# Altium PCB WGI_BOARD.PcbDoc (part 3 of 3)
Units mm, origin at the board's own origin, x right, y up, seen from the top; angles counter-clockwise.
Board outline 79.5 x 49.7 mm, 4 copper layers (Top Layer, Layer 1, Layer 2, Bottom Layer), stack 1.454 mm thick; 210 components, 179 nets, 665 pads, 228 vias.
Unrouted connection lines stored in the file: 133.
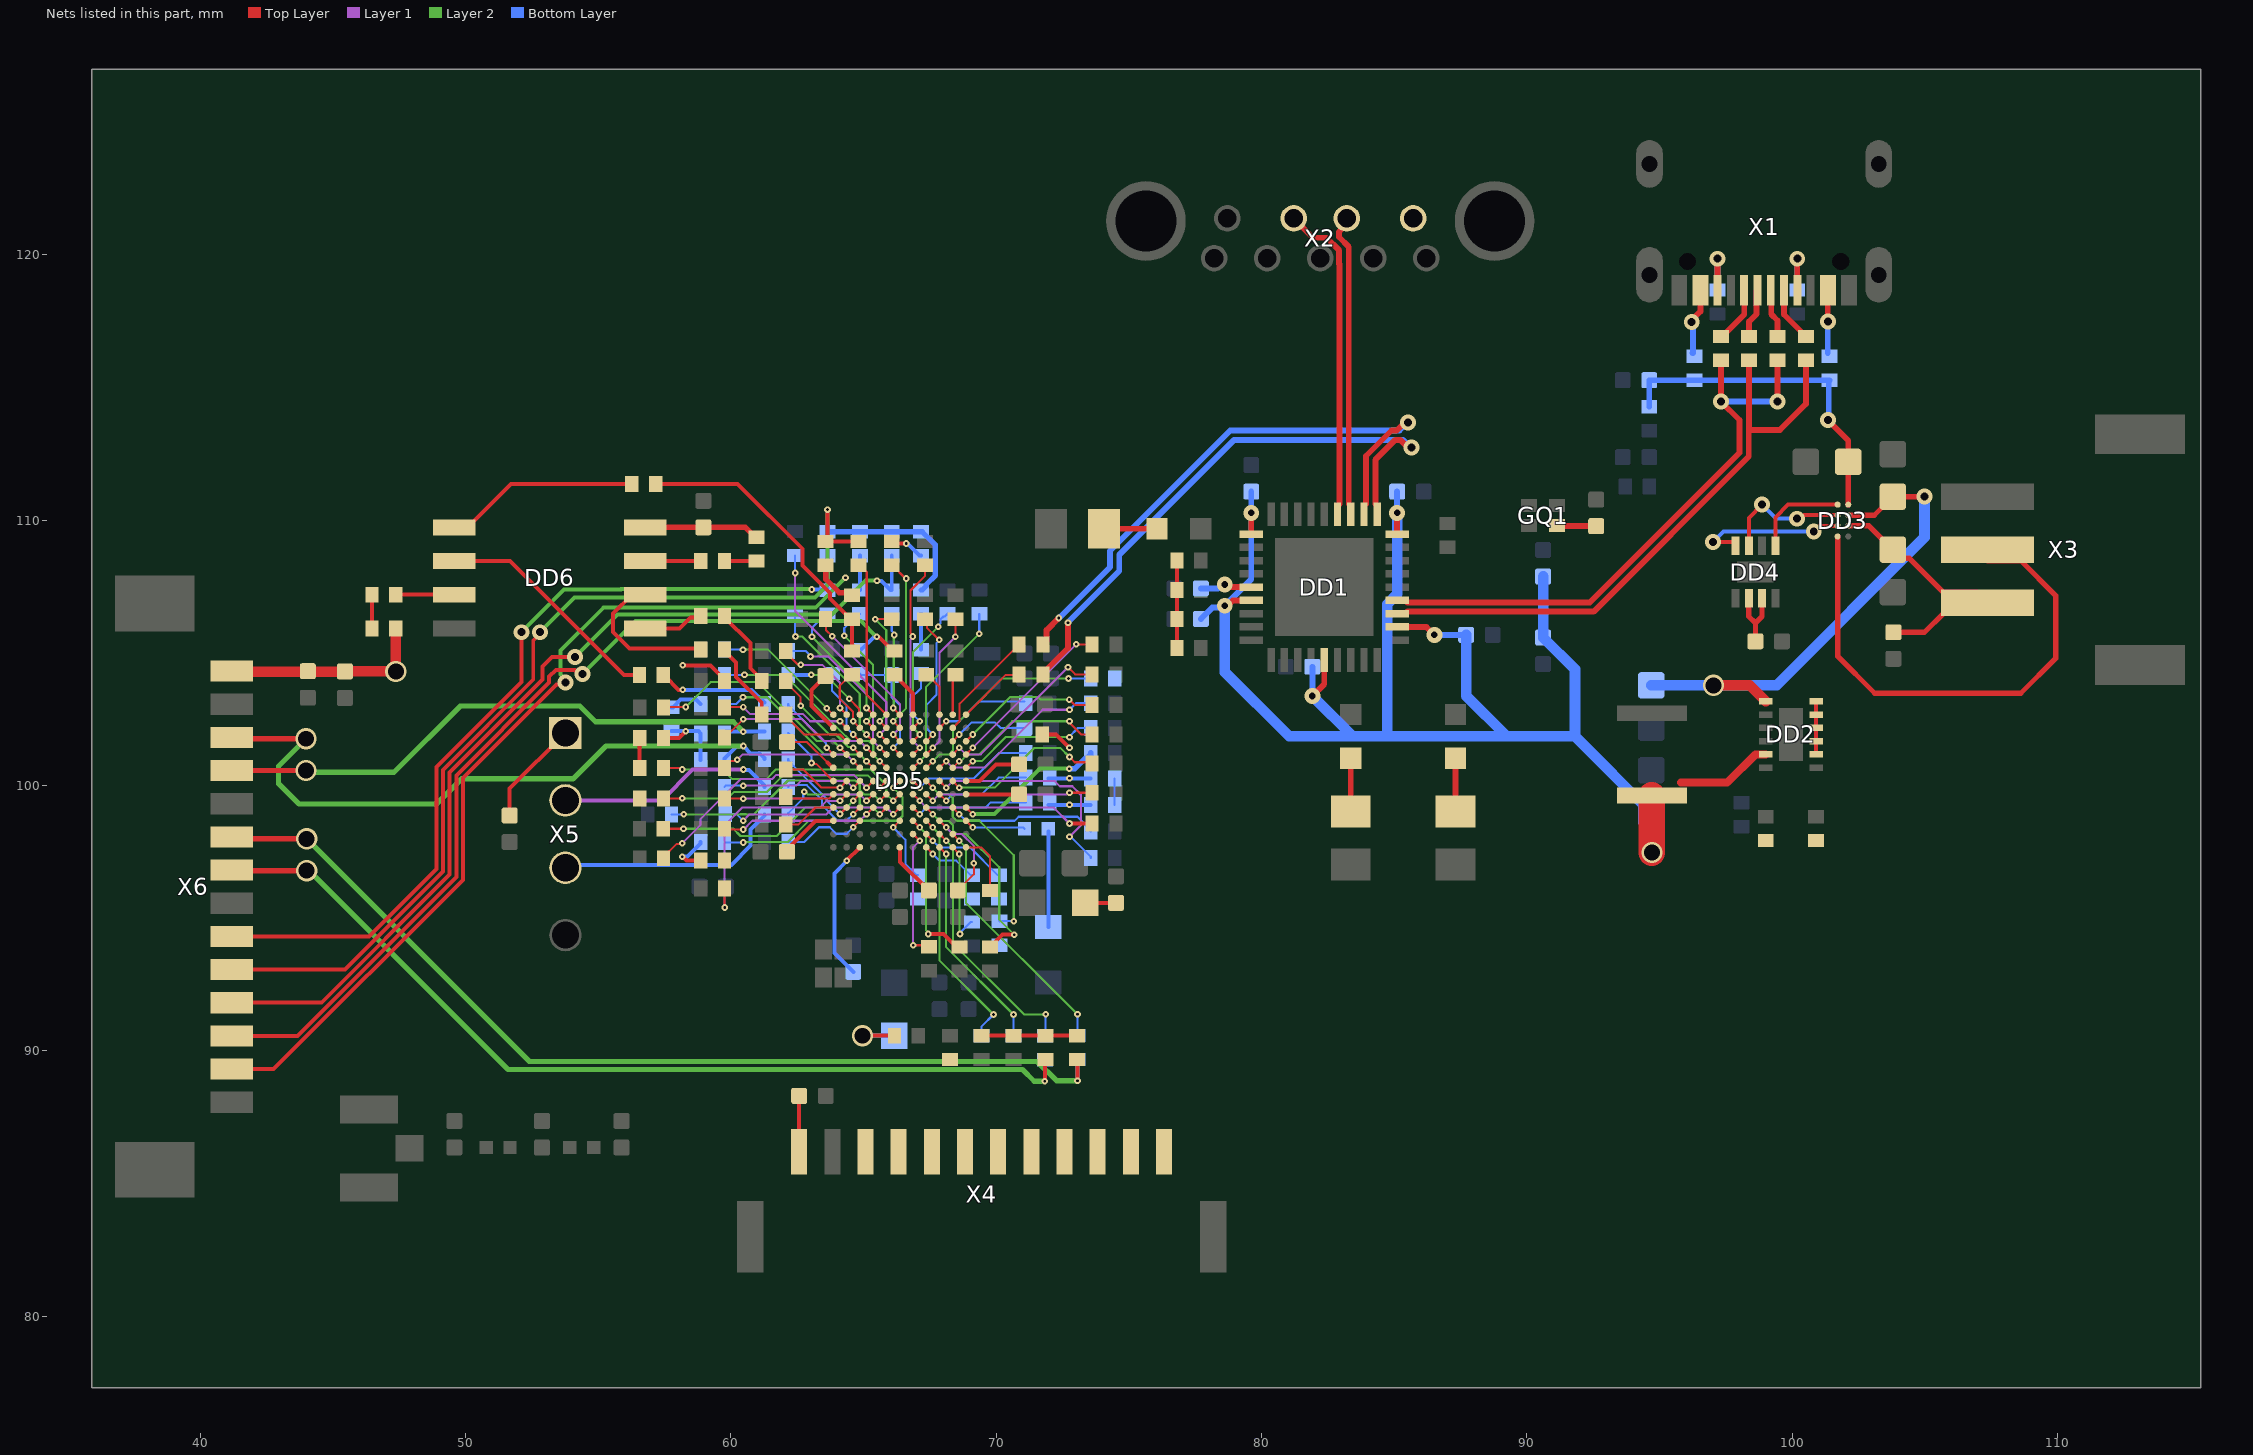
[diagram p4: the nets of this part, all layers, seen from the top]

## Via types
v1: diameter 0.25, hole 0.1, Top Layer to Bottom Layer, 179 vias
v2: diameter 0.6, hole 0.3, Top Layer to Bottom Layer, 24 vias
v3: diameter 0.8, hole 0.6, Top Layer to Bottom Layer, 18 vias
v4: diameter 0.6, hole 0.25, Top Layer to Bottom Layer, 7 vias

## Nets (pads, with @x,y where several pads share a name; then routed paths per layer and width w, separated by ;. In a path a pad name is that pad's centre, name@x,y a point inside that pad or via, vN(x,y) a via of type N, cw(c..) or ccw(c..) an arc to the next point about the centre after c; other vN are vias at no path point) (continued)
NetDD3_A1: DD3.A1 DD4.5 R109.1 R128.1 | length 4.9
  Top Layer w0.15: R128.1@66.06,109.17 66.11,109.12 v1(66.602,109.12) ; DD4.5@99.361,109.035 99.361,110.104 99.843,110.586 DD3.A1@101.71,110.586
  Bottom Layer w0.15: v1@66.652,109.12 67.11,108.662 R109.1@67.16,108.662
NetDD3_B1: DD3.B1 DD4.7 R26.1 R51.1 X4.9 | length 6.5
  Top Layer w0.15: DD4.7@98.361,109.035 98.361,110.086 v2(98.861,110.586) ; v2(100.186,110.055) 100.308,110.055 100.439,110.186 DD3.B1@101.71,110.186
  Bottom Layer w0.15: R51.1@71.96,100.27 v1(72.76,100.27) R26.1@73.56,100.27 ; v2(98.861,110.586) 99.392,110.055 v2(100.186,110.055)
NetDD3_C1: DD3.C1 DD4.8 R27.1 R52.1 X4.10 | length 7.5
  Top Layer w0.15: v2(97.01,109.175) 97.786,109.175 97.861,109.1 DD4.8@97.861,109.035 ; v2(100.81,109.575) 101.021,109.786 DD3.C1@101.71,109.786
  Bottom Layer w0.15: R52.1@71.96,99.27 v1(72.76,99.27) R27.1@73.56,99.27 ; v2(97.01,109.175) 97.41,109.575 v2(100.81,109.575)
NetDD5_A1: DD5.A1 R22.2 | length 2.3
  Top Layer w0.08: DD5.A1@68.86,97.67 69.435,97.67 69.76,97.345 R22.2@69.76,96.046
NetDD5_A2: DD5.A2 R39.2 | length 4.1
  Top Layer w0.08: DD5.A2@68.36,97.67 v1(68.61,97.42)
  Layer 2 w0.08: v1(68.61,97.42) 68.61,94.424 v1(68.631,94.403)
  Bottom Layer w0.08: v1@68.631,94.379 68.631,94.453 69.031,94.853 R39.2@69.081,94.853
NetDD5_A3: DD5.A3 R41.2 | length 8.3
  Top Layer w0.08: DD5.A3@67.86,97.67 v1(68.11,97.42)
  Layer 2 w0.08: v1(68.11,97.42) 68.11,93.907 v1(70.647,91.37)
  Bottom Layer w0.08: R41.2@70.647,90.57 v1(70.647,91.37)
NetDD5_A4: DD5.A4 R78.2 | length 2.2
  Top Layer w0.08: DD5.A4@67.36,97.67 v1(67.61,97.42)
  Bottom Layer w0.08: v1(67.61,97.42) 67.86,97.17 68.489,97.17 69.039,96.62 R78.2@69.089,96.62
NetDD5_B2: DD5.B2 R81.2 | length 9.5
  Top Layer w0.08: DD5.B2@68.36,98.17 v1(68.61,97.92)
  Layer 2 w0.08: v1(68.61,97.92) 68.855,97.675 68.855,95.58 v1(73.06,91.375)
  Bottom Layer w0.08: R81.2@73.06,90.575 v1(73.06,91.375)
NetDD5_B3: DD5.B3 R83.2 | length 9.7
  Top Layer w0.08: DD5.B3@67.86,98.17 v1(68.11,97.92)
  Layer 2 w0.08: v1(68.11,97.92) 68.365,97.665 68.365,94.056 71.046,91.375 v1(71.86,91.375)
  Bottom Layer w0.08: R83.2@71.86,90.575 v1(71.86,91.375)
NetDD5_B4: DD5.B4 R54.2 | length 3.4
  Top Layer w0.08: DD5.B4@67.36,98.17 v1(67.61,97.92)
  Bottom Layer w0.08: v1(67.61,97.92) 67.865,97.665 69.015,97.665 70.06,96.62 R54.2@70.11,96.62
NetDD5_B5: DD5.B5 R84.2 | length 5.1
  Top Layer w0.08: DD5.B5@66.86,98.17 v1(67.11,97.92) ; v1(66.865,93.978) 67.399,93.978 R84.2@67.457,93.92
  Layer 1 w0.08: v1@66.915,93.928 v1(66.865,93.978) 66.865,97.675 v1(67.11,97.92)
NetDD5_C1: DD5.C1 L3.2 | length 2.3
  Top Layer w0.08: DD5.C1@68.86,98.67 v1(69.11,98.42)
  Bottom Layer w0.08: v1(69.11,98.42) 71.01,98.42 L3.2@71.06,98.37
NetDD5_C4: DD5.C4 R40.2 | length 9.3
  Top Layer w0.08: DD5.C4@67.36,98.67 v1(67.61,98.42)
  Layer 2 w0.08: v1(67.61,98.42) 67.855,98.175 67.855,93.412 v1(69.897,91.37)
  Bottom Layer w0.08: R40.2@69.447,90.57 69.447,90.92 v1(69.897,91.37)
NetDD5_C5: DD5.C5 R82.2 | length 5.8
  Top Layer w0.08: DD5.C5@66.86,98.67 v1(67.11,98.42)
  Top Layer w0.15: v1(67.44,94.403) 68.018,94.403 68.508,93.913 R82.2@68.558,93.913
  Layer 2 w0.08: v1(67.11,98.42) 67.355,98.175 67.355,94.534 67.44,94.449 v1(67.44,94.403)
NetDD5_C6: DD5.C6 R80.2 | length 2.6
  Top Layer w0.08: v1(66.11,98.42) DD5.C6@66.36,98.67
  Bottom Layer w0.08: v1(66.11,98.42) 66.573,97.957 66.573,97.043 66.996,96.62 R80.2@67.046,96.62
NetDD5_C9: DD5.C9 R105.2 | length 3.2
  Top Layer w0.08: v1(64.61,98.425) 64.613,98.425 64.858,98.67 DD5.C9@64.86,98.67
  Bottom Layer w0.08: R105.2@62.16,97.87 62.76,97.87 63.317,98.427 63.73,98.427 63.975,98.182 64.367,98.182 v1(64.61,98.425)
NetDD5_D1: DD5.D1 R77.2 | length 5.8
  Top Layer w0.08: DD5.D1@68.86,99.17 v1(69.11,98.92)
  Layer 2 w0.15: v1(69.11,98.92) 69.941,98.92 71.656,100.635 v1(72.744,100.635)
  Bottom Layer w0.2: v1(72.744,100.635) 72.963,100.635 73.36,101.032 73.41,101.032 73.56,101.182 R77.2@73.56,101.232
NetDD5_D2: DD5.D2 R53.2 | length 5.7
  Top Layer w0.08: DD5.D2@68.36,99.17 v1(68.61,98.92)
  Bottom Layer w0.08: v1(68.61,98.92) 68.86,98.67 70.69,98.67 70.842,98.821 73.059,98.821 73.56,98.32 R53.2@73.56,98.27
NetDD5_D4: DD5.D4 R79.2 | length 7.7
  Top Layer w0.08: DD5.D4@67.36,99.17 v1(67.61,98.92)
  Top Layer w0.15: R79.2@69.76,93.913 69.81,93.913 69.985,94.088 69.985,94.138 70.231,94.384 70.672,94.384 v1(70.677,94.379)
  Layer 2 w0.08: v1(67.61,98.92) 67.865,98.665 68.212,98.665 68.365,98.511 68.365,98.319 68.509,98.175 68.855,98.175 70.11,96.92 70.11,94.946 v1(70.677,94.379)
NetDD5_D5: DD5.D5 R52.2 | length 4.5
  Top Layer w0.08: DD5.D5@66.86,99.17 v1(67.11,98.92)
  Bottom Layer w0.08: v1(67.11,98.92) 67.36,99.17 69.605,99.17 69.798,99.363 R52.2@71.11,99.363
NetDD5_D6: DD5.D6 R55.2 | length 7.1
  Top Layer w0.08: v1(66.11,98.92) DD5.D6@66.36,99.17
  Layer 1 w0.08: v1(60.46,98.672) 60.7,98.912 63.602,98.912 63.86,99.17 65.86,99.17 v1(66.11,98.92)
  Bottom Layer w0.08: R55.2@59.78,98.92 60.212,98.92 v1(60.46,98.672)
NetDD5_D7: DD5.D7 R59.2 | length 4.8
  Top Layer w0.08: v1(65.61,98.92) DD5.D7@65.86,99.17
  Layer 2 w0.08: v1(62.759,99.769) 62.787,99.769 62.891,99.665 64.711,99.665 64.855,99.521 64.855,99.329 65.019,99.165 65.365,99.165 v1(65.61,98.92)
  Bottom Layer w0.08: R59.2@62.16,98.91 62.16,98.96 62.726,99.526 62.726,99.736 v1(62.759,99.769)
NetDD5_D8: DD5.D8 R85.2 | length 6
  Top Layer w0.08: R85.2@59.76,98.37 59.788,98.342 v1(60.46,98.342) ; v1(65.11,98.92) DD5.D8@65.36,99.17
  Layer 1 w0.08: v1(60.46,98.342) 60.477,98.342 60.807,98.672 64.22,98.672 64.222,98.67 64.86,98.67 v1(65.11,98.92)
NetDD5_D9: DD5.D9 R58.2 | length 3.6
  Top Layer w0.08: v1(64.61,98.92) DD5.D9@64.86,99.17
  Bottom Layer w0.08: R58.2@62.16,99.95 62.224,100.014 62.86,100.014 63.434,99.44 63.434,99.254 64.008,98.68 64.37,98.68 v1(64.61,98.92)
NetDD5_D10: DD5.D10 R66.2 | length 3.2
  Top Layer w0.08: v1(64.11,98.925) 64.112,98.925 64.357,99.17 DD5.D10@64.36,99.17
  Bottom Layer w0.08: R66.2@62.16,100.99 62.16,100.94 62.37,100.73 63.609,99.491 63.609,99.421 63.905,99.125 63.952,99.078 v1(64.11,98.925)
NetDD5_D11: DD5.D11 R86.2 | length 2.1
  Top Layer w0.08: R86.2@62.06,98.537 62.552,98.537 63.185,99.17 DD5.D11@63.86,99.17
NetDD5_E3: DD5.E3 R51.2 | length 3.7
  Top Layer w0.08: DD5.E3@67.86,99.67 v1(68.11,99.42)
  Bottom Layer w0.08: v1(68.11,99.42) 68.355,99.665 69.455,99.665 70.087,100.297 R51.2@71.11,100.297
NetDD5_E4: DD5.E4 R74.2 | length 6.4
  Top Layer w0.08: DD5.E4@67.36,99.67 v1(67.61,99.42) ; v1(72.76,99.728) R74.2@73.547,99.728
  Layer 1 w0.08: v1(67.61,99.42) 67.855,99.665 72.651,99.665 72.714,99.728 v1(72.76,99.728)
NetDD5_E5: DD5.E5 R50.2 | length 7.2
  Top Layer w0.08: DD5.E5@66.86,99.67 v1(67.11,99.42)
  Top Layer w0.15: v1(72.76,98.57) R50.2@73.61,98.57
  Layer 1 w0.08: v1(67.11,99.42) 67.365,99.165 72.165,99.165 v1(72.76,98.57)
NetDD5_E6: DD5.E6 R98.2 | length 10
  Top Layer w0.08: R98.2@57.46,100.658 58.105,100.658 v1(58.16,100.603) ; v1(66.11,99.42) DD5.E6@66.36,99.67
  Layer 2 w0.08: v1(58.16,100.603) 59.688,100.603 60.053,100.239 61.329,100.239 61.693,100.603 65.273,100.603 65.855,100.021 65.855,99.675 v1(66.11,99.42)
NetDD5_E7: DD5.E7 R91.2 | length 9.2
  Top Layer w0.08: v1(65.61,99.42) DD5.E7@65.86,99.67
  Layer 2 w0.08: v1(58.227,98.912) 60.354,98.912 60.359,98.917 60.562,98.917 60.566,98.912 60.868,98.912 62.148,100.191 64.685,100.191 64.855,100.021 64.855,99.829 65.019,99.665 65.365,99.665 v1(65.61,99.42)
  Bottom Layer w0.08: R91.2@57.76,98.912 v1@58.237,98.912
NetDD5_E8: DD5.E8 R87.2 | length 5.9
  Top Layer w0.08: R87.2@59.76,99.514 59.77,99.504 v1(60.46,99.504) ; v1(65.11,99.42) DD5.E8@65.36,99.67
  Layer 1 w0.08: v1(60.46,99.504) 60.47,99.514 63.374,99.514 63.525,99.665 64.855,99.665 65.1,99.42 v1(65.11,99.42)
NetDD5_E9: DD5.E9 R88.2 | length 8.1
  Top Layer w0.08: R88.2@57.51,98.37 v1(58.21,98.37) ; v1(64.61,99.42) DD5.E9@64.86,99.67
  Layer 2 w0.08: v1(58.21,98.37) 60.085,98.37 60.359,98.097 61.729,98.097 62.802,99.17 64.36,99.17 v1(64.61,99.42)
NetDD5_E10: DD5.E10 R90.2 | length 8.9
  Top Layer w0.08: v1(59.76,95.4) R90.2@59.76,96.12 ; v1(64.11,99.42) DD5.E10@64.36,99.67
  Layer 1 w0.08: v1(59.76,95.4) 59.76,98.508 60.422,99.17 63.36,99.17 63.61,99.42 v1(64.11,99.42)
NetDD5_E11: DD5.E11 R89.2 | length 1.9
  Top Layer w0.08: R89.2@62.06,99.513 63.703,99.513 DD5.E11@63.86,99.67
NetDD5_F2: DD5.F2 R76.2 | length 6.2
  Top Layer w0.08: DD5.F2@68.36,100.17 v1(68.61,99.92) ; v1(72.76,101.075) 72.957,100.878 73.497,100.878 R76.2@73.547,100.828
  Layer 2 w0.08: v1(68.61,99.92) 69.941,99.92 71.441,101.42 72.415,101.42 v1(72.76,101.075)
NetDD5_F3: DD5.F3 R48.2 | length 8.7
  Top Layer w0.08: DD5.F3@67.86,100.17 v1(68.11,99.92)
  Layer 1 w0.08: v1(68.11,99.92) 68.355,100.165 72.205,100.165 72.397,99.973 72.862,99.973 73.19,99.645 73.19,98.505 v1(72.76,98.075)
  Bottom Layer w0.08: v1(72.76,98.075) 72.801,98.075 73.56,97.316 R48.2@73.56,97.266
NetDD5_F4: DD5.F4 R38.2 | length 7.9
  Top Layer w0.08: DD5.F4@67.36,100.17 v1(67.61,99.92)
  Layer 2 w0.08: v1(67.61,99.92) 67.855,99.675 68.202,99.675 68.358,99.519 68.358,98.826 68.514,98.67 69.36,98.67 70.66,97.37 v1(70.66,94.888)
  Bottom Layer w0.08: R38.2@70.118,94.879 70.126,94.888 v1(70.66,94.888)
NetDD5_F5: DD5.F5 R31.2 | length 4.9
  Top Layer w0.08: DD5.F5@66.86,100.17 v1(67.11,99.92)
  Bottom Layer w0.08: v1(67.11,99.92) 67.46,100.27 69.16,100.27 70.122,101.232 R31.2@71.11,101.232
NetDD5_F6: DD5.F6 R101.2 | length 8.7
  Top Layer w0.08: v1(66.11,99.92) DD5.F6@66.36,100.17
  Layer 2 w0.08: v1(60.46,97.852) 60.478,97.87 62.134,97.87 62.934,98.67 64.015,98.67 64.017,98.672 64.22,98.672 64.222,98.67 66.283,98.67 66.467,98.854 66.467,99.563 v1(66.11,99.92)
  Bottom Layer w0.08: R101.2@59.76,97.87 59.778,97.852 v1(60.46,97.852)
NetDD5_F7: DD5.F7 R99.2 | length 9.1
  Top Layer w0.08: R99.2@57.46,99.514 v1(58.16,99.514) ; v1(65.61,99.92) DD5.F7@65.86,100.17
  Layer 2 w0.08: v1(58.16,99.514) 59.874,99.514 60.109,99.749 61.339,99.749 61.971,100.381 65.149,100.381 v1(65.61,99.92)
NetDD5_F8: DD5.F8 R92.2 | length 9.7
  Top Layer w0.08: R92.2@57.46,97.257 57.46,97.307 57.941,97.788 58.128,97.788 v1(58.16,97.821) ; v1(65.11,99.92) DD5.F8@65.36,100.17
  Layer 1 w0.08: v1(58.16,97.821) 58.847,98.508 58.847,98.728 60.359,100.239 61.549,100.239 61.71,100.4 64.63,100.4 v1(65.11,99.92)
NetDD5_F9: DD5.F9 R56.2 | length 5.4
  Top Layer w0.08: v1(64.61,99.92) DD5.F9@64.86,100.17
  Layer 1 w0.08: v1(60.46,99.994) 62.456,99.994 62.627,100.165 64.365,100.165 v1(64.61,99.92)
  Bottom Layer w0.08: R56.2@59.76,99.95 59.804,99.994 v1(60.46,99.994)
NetDD5_F10: DD5.F10 R64.2 | length 2.7
  Top Layer w0.08: R64.2@62.06,100.603 62.727,100.603 63.41,99.92 v1(64.11,99.92) DD5.F10@64.36,100.17
NetDD5_F11: DD5.F11 R65.2 | length 2.6
  Top Layer w0.08: v1(63.035,100.848) 63.068,100.816 63.214,100.816 DD5.F11@63.86,100.17
  Bottom Layer w0.08: R65.2@62.16,101.98 63.035,101.105 v1(63.035,100.848)
NetDD5_G1: DD5.G1 R49.2 | length 5.3
  Top Layer w0.08: DD5.G1@68.86,100.67 v1(69.11,100.92)
  Layer 2 w0.08: v1(69.11,100.92) 69.447,100.92 70.349,101.823 v1@72.735,101.823
  Bottom Layer w0.08: v1@72.734,101.823 73.078,102.166 R49.2@73.56,102.166
  other v1: 72.76,101.823
NetDD5_G2: DD5.G2 R75.2 | length 6.1
  Top Layer w0.08: DD5.G2@68.36,100.67 v1(68.61,100.92) ; v1@72.703,102.42 73.195,101.928 R75.2@73.547,101.928
  Layer 2 w0.08: v1(68.61,100.92) 68.656,100.92 68.911,101.175 69.355,101.175 70.6,102.42 v1@72.703,102.42
  other v1: 72.76,102.42
NetDD5_G3: DD5.G3 R47.2 | length 7
  Top Layer w0.08: DD5.G3@67.86,100.67 v1(68.11,100.92)
  Layer 1 w0.08: v1(68.11,100.92) 68.355,100.675 69.565,100.675 71.747,102.857 v1(72.76,102.857)
  Bottom Layer w0.08: v1@72.716,102.857 v1(72.76,102.857) 73.004,103.101 R47.2@73.56,103.101
NetDD5_G4: DD5.G4 R35.2 | length 8.1
  Top Layer w0.08: DD5.G4@67.36,100.67 v1(67.61,100.92)
  Layer 2 w0.08: v1(67.61,100.92) 67.855,101.165 68.212,101.165 68.365,101.319 68.365,102.175 70.225,104.035 v1(72.72,104.035)
  Bottom Layer w0.08: v1@72.703,104.052 v1(72.72,104.035) R35.2@73.56,104.035
NetDD5_G5: DD5.G5 R126.2 | length 6.8
  Top Layer w0.08: DD5.G5@66.86,100.67 v1(67.11,100.92)
  Layer 2 w0.08: v1(67.11,100.92) 67.355,101.165 67.355,103.716 v1(69.36,105.721)
  Bottom Layer w0.08: v1(69.36,105.721) R126.2@69.36,106.47
NetDD5_G7: DD5.G7 R118.2 | length 7.8
  Top Layer w0.08: v1(65.61,100.92) DD5.G7@65.86,100.67
  Layer 2 w0.08: v1(60.51,104.17) 62.005,104.17 64.095,102.08 64.104,102.08 64.509,101.675 65.201,101.675 65.365,101.512 65.365,101.165 v1(65.61,100.92)
  Bottom Layer w0.08: R118.2@59.76,104.17 v1(60.51,104.17)
NetDD5_G8: DD5.G8 R100.2 | length 6.8
  Top Layer w0.08: v1(65.11,100.92) DD5.G8@65.36,100.67
  Layer 2 w0.08: v1(60.455,103.328) 61.356,103.328 63.509,101.175 64.855,101.175 v1(65.11,100.92)
  Bottom Layer w0.08: R100.2@59.76,103.07 60.197,103.07 v1(60.455,103.328)
NetDD5_G9: DD5.G9 R57.2 | length 5.5
  Top Layer w0.08: R57.2@59.76,100.658 59.76,100.708 59.97,100.918 60.138,100.918 60.189,100.97 v1(60.235,100.97) ; v1(64.61,100.92) DD5.G9@64.86,100.67
  Layer 1 w0.08: v1(60.235,100.97) 60.431,101.165 64.365,101.165 v1(64.61,100.92)
NetDD5_H1: DD5.H1 R46.2 | length 6.5
  Top Layer w0.08: DD5.H1@68.86,101.17 v1(69.11,101.42) ; v1(73.019,105.32) R46.2@73.61,105.32
  Layer 1 w0.08: v1(69.11,101.42) 73.01,105.32 v1(73.019,105.32)
NetDD5_H2: DD5.H2 R45.2 | length 7
  Top Layer w0.08: DD5.H2@68.36,101.17 v1(68.61,101.42) ; v1(72.703,104.462) 72.975,104.19 R45.2@73.61,104.19
  Layer 1 w0.08: v1(68.61,101.42) 68.855,101.175 69.416,101.175 v1(72.703,104.462) v1@72.67,104.494
NetDD5_H4: DD5.H4 R30.2 | length 5.7
  Top Layer w0.08: DD5.H4@67.36,101.17 v1(67.61,101.42) ; v1(68.46,105.605) R30.2@68.46,106.37
  Layer 1 w0.08: v1(67.61,101.42) 67.86,101.67 67.86,105.005 v1(68.46,105.605)
NetDD5_H5: DD5.H5 R23.2 | length 7.6
  Top Layer w0.08: v1(66.847,105.616) 66.847,105.662 66.769,105.74 66.769,107.349 67.31,107.89 R23.2@67.31,108.27 ; DD5.H5@66.86,101.17 v1(67.11,101.42)
  Layer 1 w0.08: v1(66.847,105.616) 66.847,105.571 66.76,105.484 66.76,101.77 v1(67.11,101.42)
NetDD5_H7: DD5.H7 R119.2 | length 6.2
  Top Layer w0.08: v1(65.61,101.42) DD5.H7@65.86,101.17
  Layer 1 w0.08: v1(62.999,104.864) 63.666,104.864 65.36,103.17 65.36,101.67 v1(65.61,101.42)
  Bottom Layer w0.08: R119.2@62.16,105.07 62.82,105.07 v1@63.026,104.864
NetDD5_H8: DD5.H8 R104.2 | length 6.4
  Top Layer w0.08: R104.2@59.765,101.802 v1(60.46,102.497) ; v1(65.11,101.42) DD5.H8@65.36,101.17
  Layer 1 w0.08: v1@60.462,102.497 60.474,102.509 62.671,102.509 63.505,101.675 64.855,101.675 v1(65.11,101.42)
NetDD5_H9: DD5.H9 R60.2 | length 4.2
  Top Layer w0.08: R60.2@62.06,103.945 62.06,103.895 62.627,103.328 v1(62.627,103.001) ; v1(64.61,101.42) DD5.H9@64.86,101.17
  Layer 2 w0.08: v1(62.627,103.001) 63.708,101.92 63.956,101.92 64.424,101.453 64.577,101.453 v1(64.61,101.42)
NetDD5_H10: DD5.H10 R42.2 | length 8.4
  Top Layer w0.08: R42.2@57.46,102.946 57.473,102.96 v1(58.302,102.96) ; v1(64.11,101.42) DD5.H10@64.36,101.17
  Layer 2 w0.08: v1(58.302,102.96) 59.237,103.895 61.015,103.895 63.235,101.675 63.855,101.675 v1(64.11,101.42)
NetDD5_H11: DD5.H11 R67.2 | length 2.6
  Top Layer w0.08: v1(63.61,101.42) DD5.H11@63.86,101.17
  Bottom Layer w0.08: R67.2@62.16,103.07 62.16,103.02 63.577,101.603 63.577,101.453 v1(63.61,101.42)
NetDD5_J1: DD5.J1 R73.2 | length 5.5
  Top Layer w0.08: DD5.J1@68.86,101.67 v1(69.11,101.92) ; v1(72.754,103.239) 72.964,103.028 R73.2@73.547,103.028
  Layer 2 w0.08: v1(69.11,101.92) 70.525,103.335 71.568,103.335 71.664,103.239 v1(72.754,103.239)
NetDD5_J4: DD5.J4 R28.2 | length 5.2
  Top Layer w0.08: R28.2@67.31,106.27 67.384,106.196 67.384,105.947 67.838,105.492 v1(67.851,105.492) ; DD5.J4@67.36,101.67 v1(67.61,101.92)
  Bottom Layer w0.08: v1(67.61,101.92) 67.36,102.17 67.36,103.03 67.741,103.41 67.741,105.36 67.851,105.471 v1(67.851,105.492)
NetDD5_J5: DD5.J5 R44.2 | length 5.6
  Top Layer w0.08: DD5.J5@66.86,101.67 v1(67.11,101.92)
  Layer 2 w0.08: v1(67.11,101.92) 66.865,102.165 66.865,105.037 v1(67.812,105.983)
  Bottom Layer w0.08: v1(67.812,105.983) 67.812,106.029 67.9,106.117 67.9,106.26 68.012,106.372 68.062,106.372 R44.2@68.16,106.47
NetDD5_J6: DD5.J6 R131.2 | length 6
  Top Layer w0.08: R131.2@63.56,106.27 63.576,106.254 63.576,105.861 v1(63.813,105.624) ; v1(66.11,101.92) DD5.J6@66.36,101.67
  Layer 1 w0.08: v1(63.813,105.624) 66.375,103.061 66.375,102.185 v1(66.11,101.92)
NetDD5_J7: DD5.J7 R124.2 | length 8.7
  Top Layer w0.08: v1(65.61,101.92) DD5.J7@65.86,101.67
  Layer 1 w0.08: v1(62.42,108.007) 62.42,106.58 65.855,103.145 65.855,102.165 v1(65.61,101.92)
  Bottom Layer w0.08: R124.2@62.42,108.67 v1(62.42,108.007) v1@62.436,107.991
NetDD5_J8: DD5.J8 R116.2 | length 6.2
  Top Layer w0.08: v1(65.11,101.92) DD5.J8@65.36,101.67
  Layer 2 w0.08: v1(62.43,105.614) 62.693,105.614 64.855,103.452 64.855,102.175 v1(65.11,101.92)
  Bottom Layer w0.08: R116.2@62.42,106.462 62.42,105.903 62.416,105.899 62.416,105.629 v1(62.43,105.614)
NetDD5_J9: DD5.J9 R103.2 | length 3
  Top Layer w0.08: v1(64.61,101.92) DD5.J9@64.86,101.67
  Bottom Layer w0.08: R103.2@63.81,104.22 63.81,103.565 64.355,103.02 64.355,102.175 v1(64.61,101.92)
NetDD5_J10: DD5.J10 R68.2 | length 2.7
  Top Layer w0.08: R68.2@62.06,102.62 62.76,101.92 64.11,101.92 DD5.J10@64.36,101.67
NetDD5_K2: DD5.K2 R33.2 | length 4.2
  Top Layer w0.08: DD5.K2@68.36,102.17 68.615,102.425 68.615,102.745 68.62,102.75 68.62,103.08 R33.2@70.86,105.32
NetDD5_K3: DD5.K3 R72.2 | length 3.6
  Top Layer w0.08: DD5.K3@67.86,102.17 v1(68.11,102.42)
  Bottom Layer w0.08: v1(68.11,102.42) 68.61,102.42 69.36,103.17 R72.2@71.06,103.17
NetDD5_K5: DD5.K5 R134.2 | length 2.4
  Top Layer w0.08: DD5.K5@66.86,102.17 v1(67.11,102.42)
  Bottom Layer w0.08: v1(67.11,102.42) 66.76,102.77 66.76,103.27 67.16,103.67 R134.2@67.16,104.17
NetDD5_K6: DD5.K6 R128.2 | length 6.7
  Top Layer w0.08: R128.2@66.06,108.27 66.11,108.27 66.577,107.803 v1(66.602,107.803) ; v1(66.11,102.42) DD5.K6@66.36,102.17
  Layer 2 w0.08: v1(66.11,102.42) 66.602,102.912 v1(66.602,107.803)
NetDD5_K7: DD5.K7 R122.2 | length 5.1
  Top Layer w0.08: v1@65.402,106.27 R122.2@66.059,106.27 ; v1(65.61,102.42) DD5.K7@65.86,102.17
  Layer 2 w0.08: v1(65.442,106.27) 65.855,105.857 65.855,102.665 v1(65.61,102.42)
NetDD5_K8: DD5.K8 R115.2 | length 5.2
  Top Layer w0.08: v1(65.11,102.42) DD5.K8@65.36,102.17
  Layer 2 w0.08: v1(64.264,105.646) 65.355,104.555 65.355,102.665 v1(65.11,102.42)
  Bottom Layer w0.08: v1(64.264,105.646) 64.271,105.653 64.271,105.931 64.81,106.47 R115.2@64.86,106.47
NetDD5_K9: DD5.K9 R71.2 | length 2.5
  Top Layer w0.08: R71.2@64.56,104.17 64.51,104.17 64.102,103.762 64.102,103.274 64.605,102.772 64.605,102.425 v1(64.61,102.42) DD5.K9@64.86,102.17
NetDD5_K10: DD5.K10 R102.2 | length 4.9
  Top Layer w0.08: R102.2@59.76,102.946 59.77,102.956 v1(60.46,102.956) ; v1(64.11,102.42) DD5.K10@64.36,102.17
  Layer 1 w0.08: v1@60.469,102.956 60.469,102.947 60.728,102.688 62.718,102.688 62.986,102.42 v1(64.11,102.42)
NetDD5_L1: DD5.L1 R34.2 | length 2.6
  Top Layer w0.08: DD5.L1@68.86,102.67 70.36,104.17 R34.2@70.86,104.17
NetDD5_L2: DD5.L2 R32.2 | length 1.5
  Top Layer w0.08: DD5.L2@68.36,102.67 68.36,104.07 R32.2@68.46,104.17
NetDD5_L3: DD5.L3 R29.2 | length 1.7
  Top Layer w0.08: R29.2@67.36,104.17 67.41,104.17 67.86,103.72 DD5.L3@67.86,102.67
NetDD5_L5: DD5.L5 R132.2 | length 1.8
  Top Layer w0.15: R132.2@66.16,104.17 66.21,104.17 66.385,103.995 66.385,103.945 66.86,103.47 DD5.L5@66.86,102.67
NetDD5_L6: DD5.L6 R130.2 | length 4
  Top Layer w0.08: v1(66.11,102.92) DD5.L6@66.36,102.67
  Layer 2 w0.08: v1(66.11,102.92) 66.135,102.945 66.135,105.65 v1(66.16,105.675)
  Bottom Layer w0.08: R130.2@66.06,106.47 66.06,105.821 66.16,105.721 v1(66.16,105.675)
NetDD5_L7: DD5.L7 R121.2 | length 6.1
  Top Layer w0.08: R121.2@64.81,108.3 65.02,108.09 65.073,108.09 65.119,108.043 65.119,103.411 DD5.L7@65.86,102.67
NetDD5_L8: DD5.L8 R117.2 | length 5
  Top Layer w0.08: v1(65.11,102.92) DD5.L8@65.36,102.67
  Layer 2 w0.08: v1(63.052,105.601) 65.11,103.543 v1(65.11,102.92)
  Bottom Layer w0.08: v1(63.052,105.601) 63.052,105.949 63.355,106.252 63.43,106.252 R117.2@63.64,106.462
NetDD5_L9: DD5.L9 R97.2 | length 3.4
  Top Layer w0.08: v1(64.459,103.264) 64.828,102.896 64.828,102.703 DD5.L9@64.86,102.67
  Layer 2 w0.08: v1(63.026,104.17) 63.553,104.17 v1(64.459,103.264)
  Bottom Layer w0.15: R97.2@62.16,104.17 v1(63.026,104.17)
NetDD5_L10: DD5.L10 R70.2 | length 3.9
  Top Layer w0.08: R70.2@62.06,105.07 62.06,105.02 62.503,104.578 62.594,104.578 v1(62.627,104.545) ; v1(64.11,102.919) DD5.L10@64.359,102.67
  Layer 1 w0.08: v1(62.627,104.545) 63.435,104.545 64.11,103.87 v1(64.11,102.919)
NetDD5_L11: DD5.L11 R69.2 | length 5.1
  Top Layer w0.08: v1(63.61,102.912) 63.614,102.912 63.856,102.67 DD5.L11@63.86,102.67
  Layer 2 w0.08: v1(60.455,105.12) 61.402,105.12 v1(63.61,102.912)
  Bottom Layer w0.08: R69.2@59.76,105.12 v1(60.455,105.12)
NetDD6_1: DD6.1 R120.2 | length 7.4
  Top Layer w0.15: DD6.1@49.565,109.73 50.065,109.73 51.705,111.37 R120.2@56.265,111.37
NetDD6_2: DD6.2 R125.2 | length 8.8
  Top Layer w0.15: DD6.2@49.565,108.46 51.677,108.46 55.967,104.17 R125.2@56.61,104.17
NetDD6_3: DD6.3 R127.2 | length 2.2
  Top Layer w0.15: R127.2@47.37,107.19 DD6.3@49.565,107.19
NetDD6_5: DD6.5 R123.2 | length 2.3
  Top Layer w0.15: DD6.5@56.765,105.92 58.065,105.92 58.473,106.328 58.798,106.328 R123.2@58.86,106.39
NetDD6_6: DD6.6 R133.2 | length 5.8
  Top Layer w0.15: DD6.6@56.765,107.19 56.265,107.19 55.56,106.485 55.56,105.778 56.174,105.164 58.816,105.164 R133.2@58.86,105.12
NetDD6_7: DD6.7 R129.2 | length 2.2
  Top Layer w0.15: DD6.7@56.765,108.46 R129.2@58.96,108.46
NetFB1_1: FB1.1 R43.2 | length 2.4
  Top Layer w0.15: v3(64.96,90.57) R43.2@66.16,90.57
  Bottom Layer w0.15: v3(64.96,90.57) FB1.1@66.16,90.57
NetHL1_1: HL1.1 R1.2 | length 2
  Top Layer w0.223: R1.2@74.06,109.675 HL1.1@76.06,109.675
NetHL2_1: HL2.1 R2.2 | length 2
  Top Layer w0.223: R2.2@83.36,99.025 HL2.1@83.36,101.025
NetHL3_1: HL3.1 R3.2 | length 2
  Top Layer w0.223: R3.2@87.31,99.025 HL3.1@87.31,101.025
NetL2_2: L2.2 L3.1 | length 3.6
  Bottom Layer w0.15: L2.2@71.96,94.67 L3.1@71.96,98.27
NetR9_1: R9.1 X1.A4/B9 | length 2.4
  Top Layer w0.223: v2(101.339,117.49) X1.A4/B9@101.339,118.672
  Bottom Layer w0.223: R9.1@101.339,116.308 v2(101.339,117.49)
NetR11_1: R11.1 X1.B4/A9 | length 2.5
  Top Layer w0.223: v2@96.21,117.479 96.21,117.544 96.539,117.873 X1.B4/A9@96.539,118.672
  Bottom Layer w0.223: v2(96.21,117.475) 96.26,117.425 96.26,116.314 96.254,116.308 R11.1@96.239,116.308
NetR12_1: R12.1 X1.A7 | length 1.9
  Top Layer w0.223: R12.1@98.377,116.925 98.377,117.486 98.654,117.764 98.654,118.638 X1.A7@98.689,118.672
NetR13_1: R13.1 X1.B7 | length 2.1
  Top Layer w0.223: X1.B7@99.689,118.672 99.689,117.754 100.518,116.925 R13.1@100.568,116.925
NetR14_1: R14.1 X1.A6 | length 1.9
  Top Layer w0.223: X1.A6@99.189,118.672 99.208,118.653 99.208,117.764 99.443,117.529 R14.1@99.443,116.925
NetR15_1: R15.1 X1.B6 | length 2.1
  Top Layer w0.223: R15.1@97.31,116.925 97.36,116.925 98.189,117.754 X1.B6@98.189,118.672
NetR16_2: R16.2 X1.B5 | length 2.4
  Top Layer w0.223: X1.B5@97.189,118.672 v2(97.189,119.854) v2@97.21,119.875
  Bottom Layer w0.223: R16.2@97.189,118.672 v2(97.189,119.854)
NetR17_2: R17.2 X1.A5 | length 2.4
  Top Layer w0.223: X1.A5@100.189,118.672 v2(100.189,119.854) v2@100.21,119.875
  Bottom Layer w0.223: R17.2@100.189,118.672 v2(100.189,119.854)
NetR35_1: R35.1
NetR38_1: R38.1
NetR54_1: R54.1 X4.3
NetR58_1: R58.1 X5.2 | length 8.3
  Layer 1 w0.15: X5.2@53.76,99.44 57.393,99.44 58.556,100.603 v1(60.47,100.603)
  Bottom Layer w0.15: v1(60.47,100.603) 60.489,100.584 60.676,100.584 61.26,100 R58.1@61.26,99.95
NetR59_1: R59.1 X5.3 | length 8.7
  Bottom Layer w0.15: X5.3@53.76,96.9 53.87,97.01 60.014,97.01 60.74,97.736 60.74,98.34 61.26,98.86 R59.1@61.26,98.91
NetR60_1: R60.1 R123.1 | length 3
  Top Layer w0.15: R123.1@59.76,106.39 59.76,106.34 60.735,105.365 60.735,104.42 61.16,103.995 R60.1@61.16,103.945
NetR61_1: R61.1 R71.1 R120.1 | length 11.2
  Top Layer w0.15: R120.1@57.165,111.37 60.253,111.37 62.7,108.923 62.7,108.29 63.737,107.252 63.737,107.043 64.51,106.27 R61.1@64.56,106.27 R71.1@64.56,105.07
NetR62_1: R62.1 R81.1 X6.6 | length 37.3
  Top Layer w0.15: v1(73.06,88.875) R62.1@73.06,89.657
  Top Layer w0.2: X6.6@41.185,98.063 41.258,97.99 v3(44.01,97.99)
  Layer 2 w0.2: v3@44,98 52.4,89.6 71.541,89.6 72.266,88.875 v1(73.06,88.875)
  Bottom Layer w0.15: v1(73.06,88.875) R81.1@73.06,89.675
NetR63_1: R63.1 R83.1 X6.7 | length 35.5
  Top Layer w0.15: v1(71.829,88.852) 71.829,89.652 R63.1@71.847,89.67
  Top Layer w0.2: X6.7@41.185,96.813 41.208,96.79 v3(44.01,96.79)
  Layer 2 w0.2: v3@44.1,96.8 51.6,89.3 70.982,89.3 71.429,88.852 v1(71.829,88.852)
  Bottom Layer w0.15: v1(71.829,88.852) 71.829,89.66 R83.1@71.834,89.665
NetR65_1: R65.1 R135.1 X6.4 | length 22.3
  Top Layer w0.2: X6.4@41.185,100.563 v3(43.987,100.563)
  Layer 2 w0.2: v3@43.9,100.5 47.3,100.5 49.8,103 54.3,103 54.896,102.404 60.086,102.404 v1(60.46,102.03)
  Bottom Layer w0.15: R135.1@59.76,101.967 59.823,102.03 v1(60.46,102.03) R65.1@61.26,102.03
NetR66_1: R66.1 R136.1 X6.3 | length 25.6
  Top Layer w0.2: X6.3@41.235,101.763 v3(43.987,101.763)
  Layer 2 w0.2: v3(43.987,101.763) 42.948,100.724 42.948,100.071 43.719,99.3 48.9,99.3 49.85,100.25 54.05,100.25 55.287,101.487 v1(60.47,101.487)
  Bottom Layer w0.15: R136.1@59.76,100.97 59.76,101.02 60.208,101.468 60.451,101.468 v1(60.47,101.487) 60.742,101.215 61.085,101.215 61.26,101.04 R66.1@61.26,100.99
NetR67_1: R67.1 R125.1 | length 4.2
  Top Layer w0.15: R125.1@57.51,104.17 57.51,104.12 58.022,103.608 v1@58.16,103.608
  Bottom Layer w0.15: v1(58.177,103.608) 60.772,103.608 R67.1@61.26,103.12
NetR68_1: R68.1 R133.1 | length 3
  Top Layer w0.15: R133.1@59.76,105.12 59.76,105.07 60.198,104.632 60.198,104.086 61.16,103.124 R68.1@61.16,102.67
NetR78_1: R78.1 X4.5
NetR80_1: R80.1 X4.4
NetR93_1: R93.1 R98.1 X4.6 | length 1.1
  Top Layer w0.15: R98.1@56.56,100.658 R93.1@56.56,101.784
NetR94_1: R94.1 R100.1 X4.8 | length 1.3
  Bottom Layer w0.15: R94.1@57.76,102.947 57.81,102.947 58.103,103.24 58.69,103.24 R100.1@58.86,103.07
NetR95_1: R95.1 R101.1 X4.12 | length 1.7
  Top Layer w0.15: v1(58.16,97.31) 58.187,97.31 58.327,97.17 R95.1@58.86,97.17
  Bottom Layer w0.15: v1(58.16,97.31) 58.179,97.329 58.369,97.329 58.86,97.82 R101.1@58.86,97.87
NetR99_1: R99.1 X4.7
NetR106_1: R106.1 R115.1 X6.13 | length 35.3
  Top Layer w0.15: X6.13@41.185,89.313 42.767,89.313 49.9,96.446 49.9,100.281 53.418,103.799 53.674,103.799 v2(53.76,103.885)
  Layer 2 w0.15: v2(53.76,103.885) 53.76,104.007 53.575,104.192 53.575,105.082 55.193,106.7 63.185,106.7 v1(64.318,107.833)
  Bottom Layer w0.15: R115.1@64.86,107.37 R106.1@64.86,108.662 R106.1@64.86,108.67
NetR107_1: R107.1 R117.1 X6.9 | length 32.5
  Top Layer w0.15: X6.9@41.185,94.313 46.352,94.313 48.9,96.861 48.9,100.696 52.1,103.896 52.1,104.964 52.1,105.022 v2(52.1,105.778)
  Layer 2 w0.15: v2(52.1,105.778) 53.712,107.389 55.85,107.389 55.861,107.4 63.036,107.4 v1(63.047,107.389)
  Bottom Layer w0.15: v1(63.047,107.389) 63.612,107.389 R117.1@63.64,107.362 R107.1@63.64,108.662
NetR108_1: R108.1 R121.1 X6.10 | length 36.7
  Top Layer w0.15: X6.10@41.185,93.063 45.456,93.063 49.15,96.757 49.15,100.592 52.549,103.991 52.549,105.465 52.8,105.716 v2(52.8,105.778) ; v1(63.64,110.4) 63.64,109.28 R108.1@63.56,109.2 R121.1@64.56,109.2
  Layer 2 w0.15: v2(52.8,105.778) 54.112,107.089 63.171,107.089 63.64,107.558 v1(63.64,110.4)
NetR110_1: R110.1 R130.1 X6.11 | length 35.4
  Top Layer w0.15: X6.11@41.185,91.813 44.559,91.813 49.4,96.654 49.4,100.488 52.9,103.988 52.9,104.49 53.251,104.841 v2(54.118,104.841)
  Layer 2 w0.15: v2(54.118,104.841) 55.727,106.45 63.805,106.45 65.074,107.719 v1(65.503,107.719)
  Bottom Layer w0.15: v1(65.503,107.719) 65.522,107.7 65.68,107.7 66.01,107.37 R130.1@66.06,107.37 R110.1@66.06,108.662
NetR111_1: R111.1 R132.1 X6.12 | length 35.3
  Top Layer w0.15: X6.12@41.185,90.563 43.663,90.563 49.65,96.55 49.65,100.385 53.15,103.885 53.15,104.112 53.398,104.36 54.118,104.36 54.278,104.2 v2(54.4,104.2) ; v1(65.492,105.604) 65.511,105.585 65.595,105.585 66.11,105.07 R132.1@66.16,105.07
  Layer 2 w0.15: v2(54.4,104.2) 56.4,106.2 64.897,106.2 v1(65.492,105.604)
  Bottom Layer w0.15: R111.1@64.86,105.12 64.91,105.12 65.375,105.585 65.473,105.585 v1(65.492,105.604)
NetR112_1: R112.1 R134.1 X4.11 | length 1.4
  Bottom Layer w0.15: R134.1@67.16,105.12 R112.1@67.16,106.47
NetR113_1: R113.1 R129.1 | length 1.1
  Top Layer w0.15: R129.1@59.86,108.46 R113.1@60.965,108.46
NetR114_1: R114.1 R127.1 | length 1.3
  Top Layer w0.15: R114.1@46.47,105.92 R127.1@46.47,107.19
NTS: DD3.D1 X3.2 | length 19.3
  Top Layer w0.2: DD3.D1@101.71,109.386 101.71,104.875 103.11,103.475 108.61,103.475 109.927,104.793 109.927,107.158 108.61,108.475 X3.2@107.36,108.475
P1V2_USB: C8.1 C9.1 DD1.14 GQ1.4 | length 3.5
  Top Layer w0.223: v4(78.61,107.575) 78.712,107.575 78.812,107.475 DD1.14@79.61,107.475 ; GQ1.4@91.135,109.8 91.147,109.788 92.597,109.788 C9.1@92.61,109.775
  Bottom Layer w0.223: C8.1@77.71,107.425 78.358,107.425 78.508,107.575 v4(78.61,107.575)
P3V3: C1.1 C2.1 C3.1 C4.1 C5.1 C6.1 C7.1 C13.1 C25.1 C28.1 C29.1 C30.1 C31.1 C32.1 C33.1 C34.1 C35.1 C36.1 C37.1 C39.1 C43.1 C44.1 C45.1 DD1.10 DD1.15 DD1.23 DD1.29 DD1.36 DD2.5 DD5.A6 DD5.A9 DD5.C3 DD5.C11 DD5.E1 DD5.F1 DD5.G11 DD5.H6 DD5.J2 DD5.K11 DD6.8 FB2.1 L1.2 R5.2 R6.2 R7.2 R8.2 R19.2 R24.2 R25.2 R26.2 R27.2 R36.2 R37.2 R61.2 R62.2 R63.2 R93.2 R94.2 R95.2 R96.2 R106.2 R107.2 R108.2 R109.2 R110.2 R111.2 R112.2 R113.2 R114.2 R135.2 R136.2 X5.1 X6.1 | length 133.8
  Top Layer w0.08: C33.1@62.11,101.637 62.866,101.637 63.633,100.87 ; v1(66.11,101.42) DD5.H6@66.36,101.17 ; DD5.C3@67.86,98.67 v1(68.11,98.42) ; DD5.J2@68.36,101.67 v1(68.61,101.92) ; C30.1@68.547,96.046 69.153,96.653 v1(69.153,97.075)
  Top Layer w0.15: C39.1@51.66,98.87 51.66,99.88 X5.1@53.76,101.98 ; R93.2@57.46,101.784 58.039,101.784 v1(58.302,102.047) ; v1(58.183,104.529) 59.226,104.529 59.76,103.995 R96.2@59.76,103.945 ; C35.1@62.01,97.49 63.19,98.67 DD5.C11@63.86,98.67 ; C32.1@63.56,104.12 63.035,103.595 63.035,102.995 DD5.K11@63.86,102.17 ; 63.633,100.87 63.833,100.67 DD5.G11@63.86,100.67 ; v1(64.36,97.17) DD5.A9@64.86,97.67 ; DD5.A6@66.367,97.663 66.379,97.651 66.379,97.124 C36.1@67.457,96.046 ; DD5.E1@68.86,99.67 C37.1@70.86,99.67 ; DD5.F1@68.86,100.17 69.36,100.17 69.99,100.8 C34.1@70.86,100.8 ; R24.2@69.447,90.57 R25.2@70.647,90.57 R63.2@71.847,90.57 R62.2@73.047,90.57 ; R37.2@71.73,101.93 72.25,101.93 72.759,101.421 v1(72.761,101.421) ; FB2.1@73.36,95.575 C25.1@74.51,95.575 ; R5.2@76.81,105.175 R7.2@76.81,108.475
  Top Layer w0.2: DD6.8@56.765,109.73 C43.1@58.96,109.73 60.545,109.73 60.915,109.36 R113.2@60.965,109.36 ; R108.2@63.56,108.3 63.571,108.289 63.571,107.779 64.083,107.267 64.463,107.267 R61.2@64.56,107.17
  Top Layer w0.223: v4(78.61,106.775) 78.712,106.775 78.912,106.975 DD1.15@79.61,106.975 ; DD1.10@79.61,109.475 v4(79.61,110.273) ; v4(81.914,103.371) 81.914,103.376 82.36,103.822 DD1.23@82.36,104.725 ; DD1.29@85.11,105.975 86.21,105.975 v4(86.51,105.675) ; DD1.36@85.11,109.475 v4(85.11,110.273)
  Top Layer w0.3: 95.81,100.111 97.547,100.111 98.61,101.173 DD2.5@98.999,101.173
  Top Layer w0.4: X6.1@41.185,104.313 41.205,104.294 45.45,104.294 45.456,104.3 v3(47.37,104.3) R114.2@47.37,105.92
  Top Layer w1: v3(94.71,97.475) L1.2@94.71,99.623
  Layer 1 w0.08: v1(68.11,98.42) 68.355,98.175 68.702,98.175 69.153,97.723 v1(69.153,97.075)
  Bottom Layer w0.08: R111.2@64.86,104.22 64.91,104.17 C31.1@66.06,104.17 66.06,103.317 66.375,103.001 66.375,101.685 v1(66.11,101.42) ; v1(68.61,101.92) 69.06,102.37 69.958,102.37 70.162,102.166 C28.1@71.06,102.166 ; R27.2@74.46,99.27 R26.2@74.46,100.27
  Bottom Layer w0.15: R94.2@57.76,102.047 v1(58.302,102.047) 58.78,102.047 R135.2@58.86,101.967 R136.2@58.86,100.97 ; v1(64.36,97.17) 64.36,97.145 63.905,96.691 63.905,93.684 C29.1@64.61,92.979
  Bottom Layer w0.2: R107.2@63.64,109.562 R106.2@64.86,109.562 R110.2@66.06,109.562 R109.2@67.16,109.562 67.21,109.562 67.702,109.07 67.702,107.912 67.36,107.57 67.36,107.52 67.21,107.37 R112.2@67.16,107.37
  Bottom Layer w0.223: C3.1@77.71,106.275 78.138,106.703 78.538,106.703 v4(78.61,106.775) 79.61,107.775 v4(79.61,110.273) C5.1@79.61,111.075 ; C2.1@81.91,104.475 81.912,104.473 81.912,103.373 v4(81.914,103.371) ; v4(85.11,110.273) C6.1@85.11,111.075 ; v4(86.51,105.675) C7.1@87.71,105.675
  Bottom Layer w0.4: v4(78.61,106.775) 78.61,104.275 81.035,101.85 83.435,101.85 ; v4(81.914,103.371) 83.435,101.85 ; v4(85.11,110.273) 85.11,107.217 84.73,106.837 84.73,101.93 84.81,101.85 ; C7.1@87.71,105.675 87.71,103.375 89.235,101.85 ; C4.1@90.61,107.875 C1.1@90.61,105.575 91.81,104.375 91.81,101.85 ; v3@94.685,97.475 C13.1@94.685,98.975 91.81,101.85 ; 83.435,101.85 84.81,101.85 ; 84.81,101.85 89.235,101.85 ; 89.235,101.85 91.81,101.85
  Bottom Layer w0.6: v3@94.685,97.475 v3(94.71,97.475)
P5V_BAT: C15.1 C17.1 C18.1 DD3.C2 DD4.2 DD4.3 X3.1 | length 13.2
  Top Layer w0.2: DD4.2@98.361,107.055 98.361,106.369 98.611,106.119 ; C17.1@98.611,105.435 98.611,106.119 ; DD4.3@98.861,107.055 98.861,106.369 98.611,106.119 ; DD3.C2@102.11,109.786 102.888,109.786 104.115,108.559 104.412,108.559 105.685,107.286 106.96,107.286 X3.1@107.36,106.886 106.96,106.486 105.696,106.486 104.985,105.775 C18.1@103.81,105.775
P5V_SYS: C12.1 C16.1 DD2.1 DD2.8 DD2.9 DD2.10 DD2.11 DD2.12 DD3.B2 X2.1 | length 21.5
  Top Layer w0.15: DD2.8@100.899,101.173 DD2.12@100.899,103.173
  Top Layer w0.2: DD3.B2@102.11,110.186 103.088,110.186 C16.1@103.788,110.886 v2(104.985,110.886)
  Top Layer w0.4: v3(97.032,103.775) 98.397,103.775 DD2.1@98.999,103.173
  Bottom Layer w0.4: C12.1@94.685,103.775 v3@97.007,103.775 ; v3(97.032,103.775) 99.41,103.775 104.985,109.35 v2(104.985,110.886)
P5V_USB: C10.1 C14.1 DD3.A2 R9.2 R10.1 R11.2 | length 13.9
  Top Layer w0.223: v2(101.339,113.775) 102.11,113.004 102.11,111.188 ; DD3.A2@102.11,110.586 C14.1@102.11,112.2
  Bottom Layer w0.223: R10.1@94.61,114.275 C10.1@94.61,115.275 R11.2@96.31,115.275 R9.2@101.41,115.275 101.374,115.24 101.374,113.811 v2(101.339,113.775)
USB_DN_DN: DD1.3 X2.2 | length 11.5
  Top Layer w0.223: X2.2@83.21,121.375 83.21,121.165 82.914,120.869 82.914,120.672 83.285,120.301 83.285,110.611 83.36,110.535 DD1.3@83.36,110.225
USB_DN_DP: DD1.4 X2.3 | length 12.2
  Top Layer w0.223: X2.3@81.21,121.375 81.94,120.646 82.445,120.646 82.921,120.17 82.921,119.664 82.935,119.65 82.935,110.611 82.86,110.535 DD1.4@82.86,110.225
USB_FLEX_DN: DD1.30 R12.2 R13.2 | length 23.5
  Top Layer w0.223: DD1.30@85.11,106.475 85.42,106.475 85.495,106.551 92.512,106.551 98.359,112.398 98.359,113.389 98.377,113.406 ; R12.2@98.377,116.025 98.377,113.406 ; R13.2@100.51,116.025 100.51,114.375 99.54,113.406 98.377,113.406
USB_FLEX_DP: DD1.31 R14.2 R15.2 | length 22.7
  Top Layer w0.223: DD1.31@85.11,106.975 85.42,106.975 85.495,106.9 92.367,106.9 98.01,112.543 98.01,113.775 v2(97.31,114.475) R15.2@97.31,116.025 ; v2(99.443,114.475) R14.2@99.443,116.025
  Bottom Layer w0.223: v2(97.31,114.475) v2(99.443,114.475)
USB_SWAP_DN: DD1.1 R34.1 | length 22.5
  Top Layer w0.223: R34.1@71.76,104.19 71.76,104.24 72.703,105.183 v1(72.703,106.138) ; DD1.1@84.36,110.225 84.36,110.535 84.285,110.611 84.285,112.273 85.04,113.029 85.224,113.029 85.522,112.732 v2(85.643,112.732)
  Bottom Layer w0.223: v1(72.703,106.138) 72.703,106.153 74.636,108.086 74.636,108.701 78.963,113.029 85.324,113.029 85.622,112.732 v2(85.643,112.732)
USB_SWAP_DP: DD1.2 R33.1 | length 22.1
  Top Layer w0.223: R33.1@71.76,105.32 71.899,105.459 71.899,105.858 v1(72.353,106.314) v1(72.353,106.314) ; DD1.2@83.86,110.225 83.86,110.535 83.935,110.611 83.935,112.418 84.895,113.378 85.091,113.378 85.388,113.675 v2(85.51,113.675)
  Bottom Layer w0.223: v1(72.353,106.314) 72.367,106.328 72.383,106.328 74.286,108.231 74.286,108.846 78.818,113.378 85.191,113.378 85.488,113.675 v2(85.51,113.675)
VDD_OLED: C38.1 R21.2 X4.1 | length 2.1
  Top Layer w0.15: X4.1@62.571,86.197 C38.1@62.571,88.3
pads on no net: DD1.5 DD1.6 DD1.7 DD1.8 DD1.9 DD1.18 DD1.19 DD1.20 DD1.21 DD1.32 DD1.34 GQ1.1 R22.1 R23.1 R28.1 R29.1 R30.1 R31.1 R32.1 R39.1 R42.1 R44.1 R45.1 R46.1 R47.1 R48.1 R49.1 R50.1 R53.1 R55.1 R56.1 R57.1 R64.1 R69.1 R70.1 R72.1 R73.1 R74.1 R75.1 R76.1 R77.1 R79.1 R82.1 R84.1 R85.1 R86.1 R87.1 R88.1 R89.1 R90.1 R91.1 R92.1 R97.1 R103.1 R104.1 R116.1 R118.1 R119.1 R124.1 R126.1 R131.1 X1. X1.A8 X1.B8 X2.5 X2.6 X2.8 X2.9 X6.MP1 X6.MP2

## Silkscreen, mask and mechanical layers (free items; w line width, h text height)
Top Overlay:
  text "ZIS_WGI_MCU_rev01" at 90.9,89.478 h1
  text "Искупал тебя в урине будто молодой тризини" at 91,86.988 h1
  text "Мне очередная краля оформляет пососини" at 91,85.728 h1